# Altium PCB Breakout_board.PcbDoc
Units mil, origin at the board's own origin, x right, y up, seen from the top; angles counter-clockwise.
Board outline 2210.03 x 2900.03 mil, 2 copper layers (Top Layer, Bottom Layer), stack 62.2 mil thick; 11 components, 34 nets, 128 pads, 0 vias.
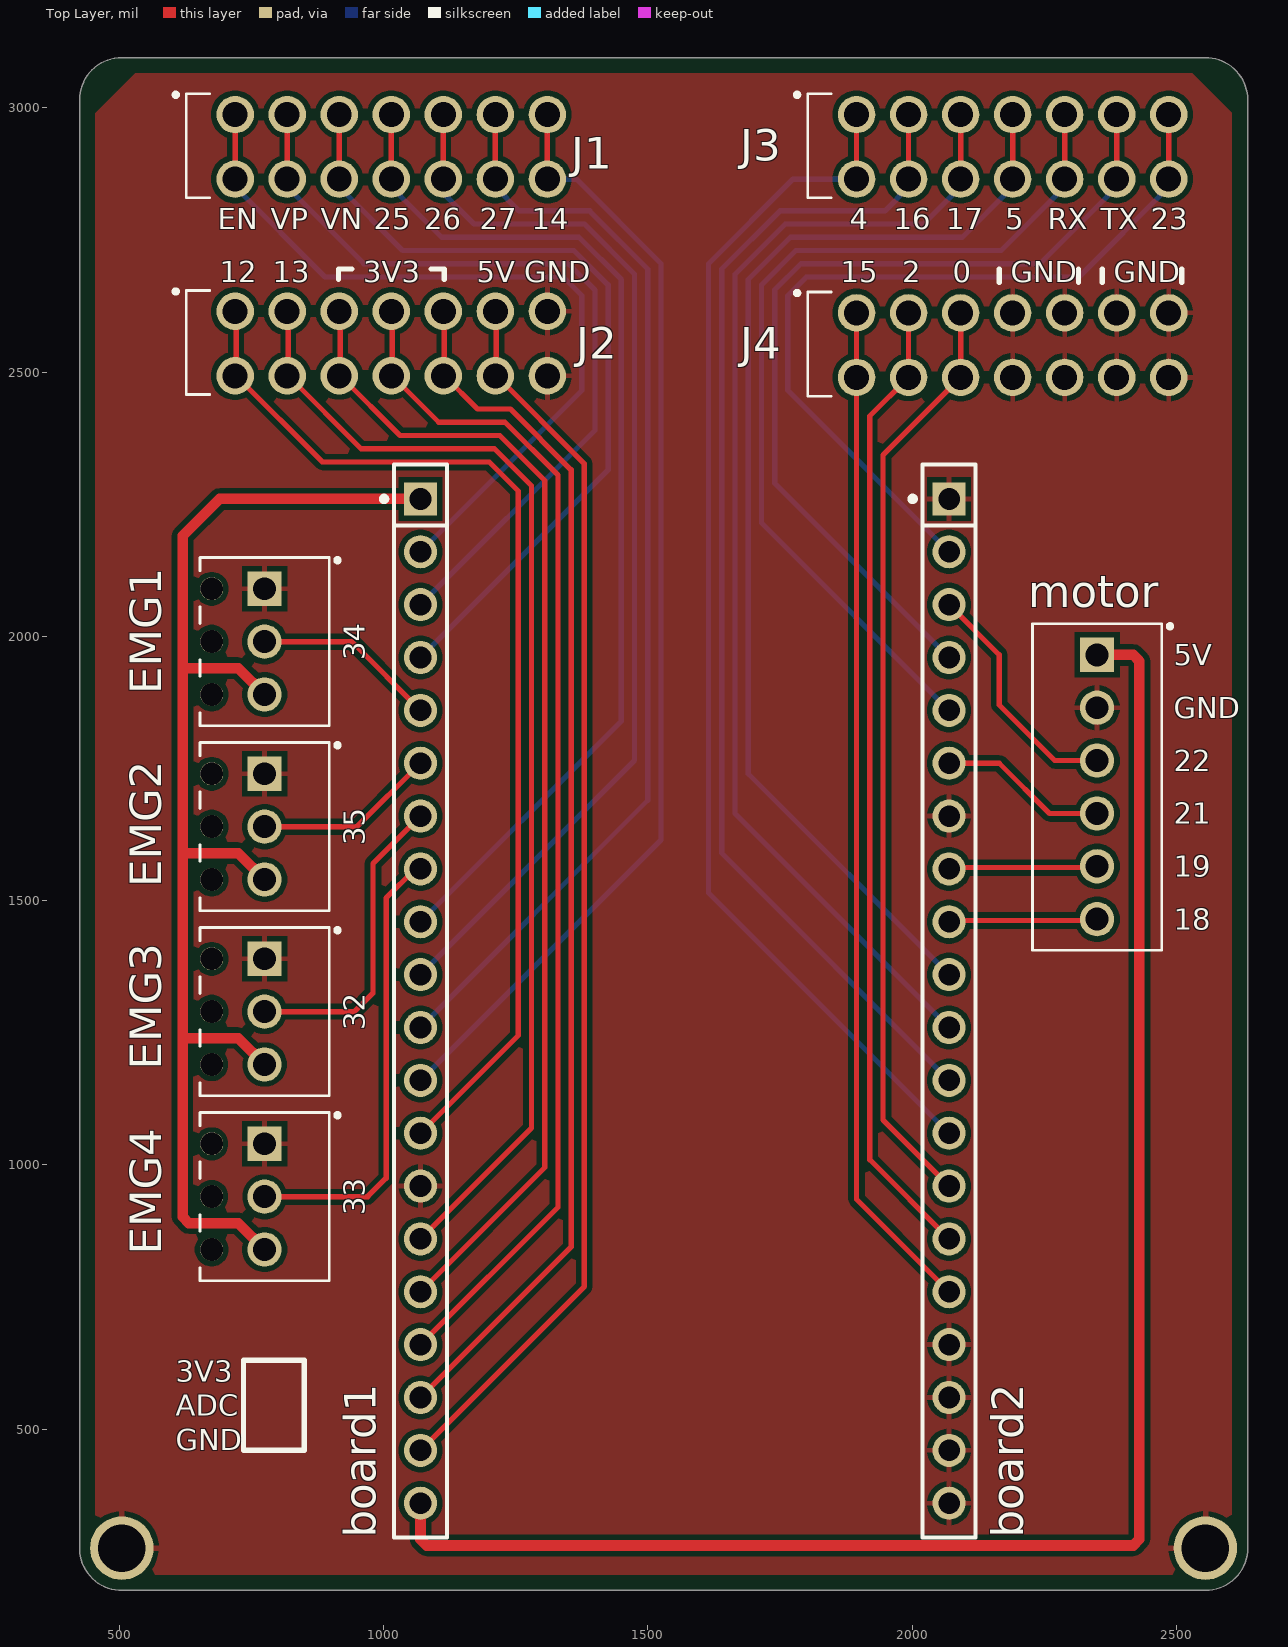
[diagram p0: Top Layer view]
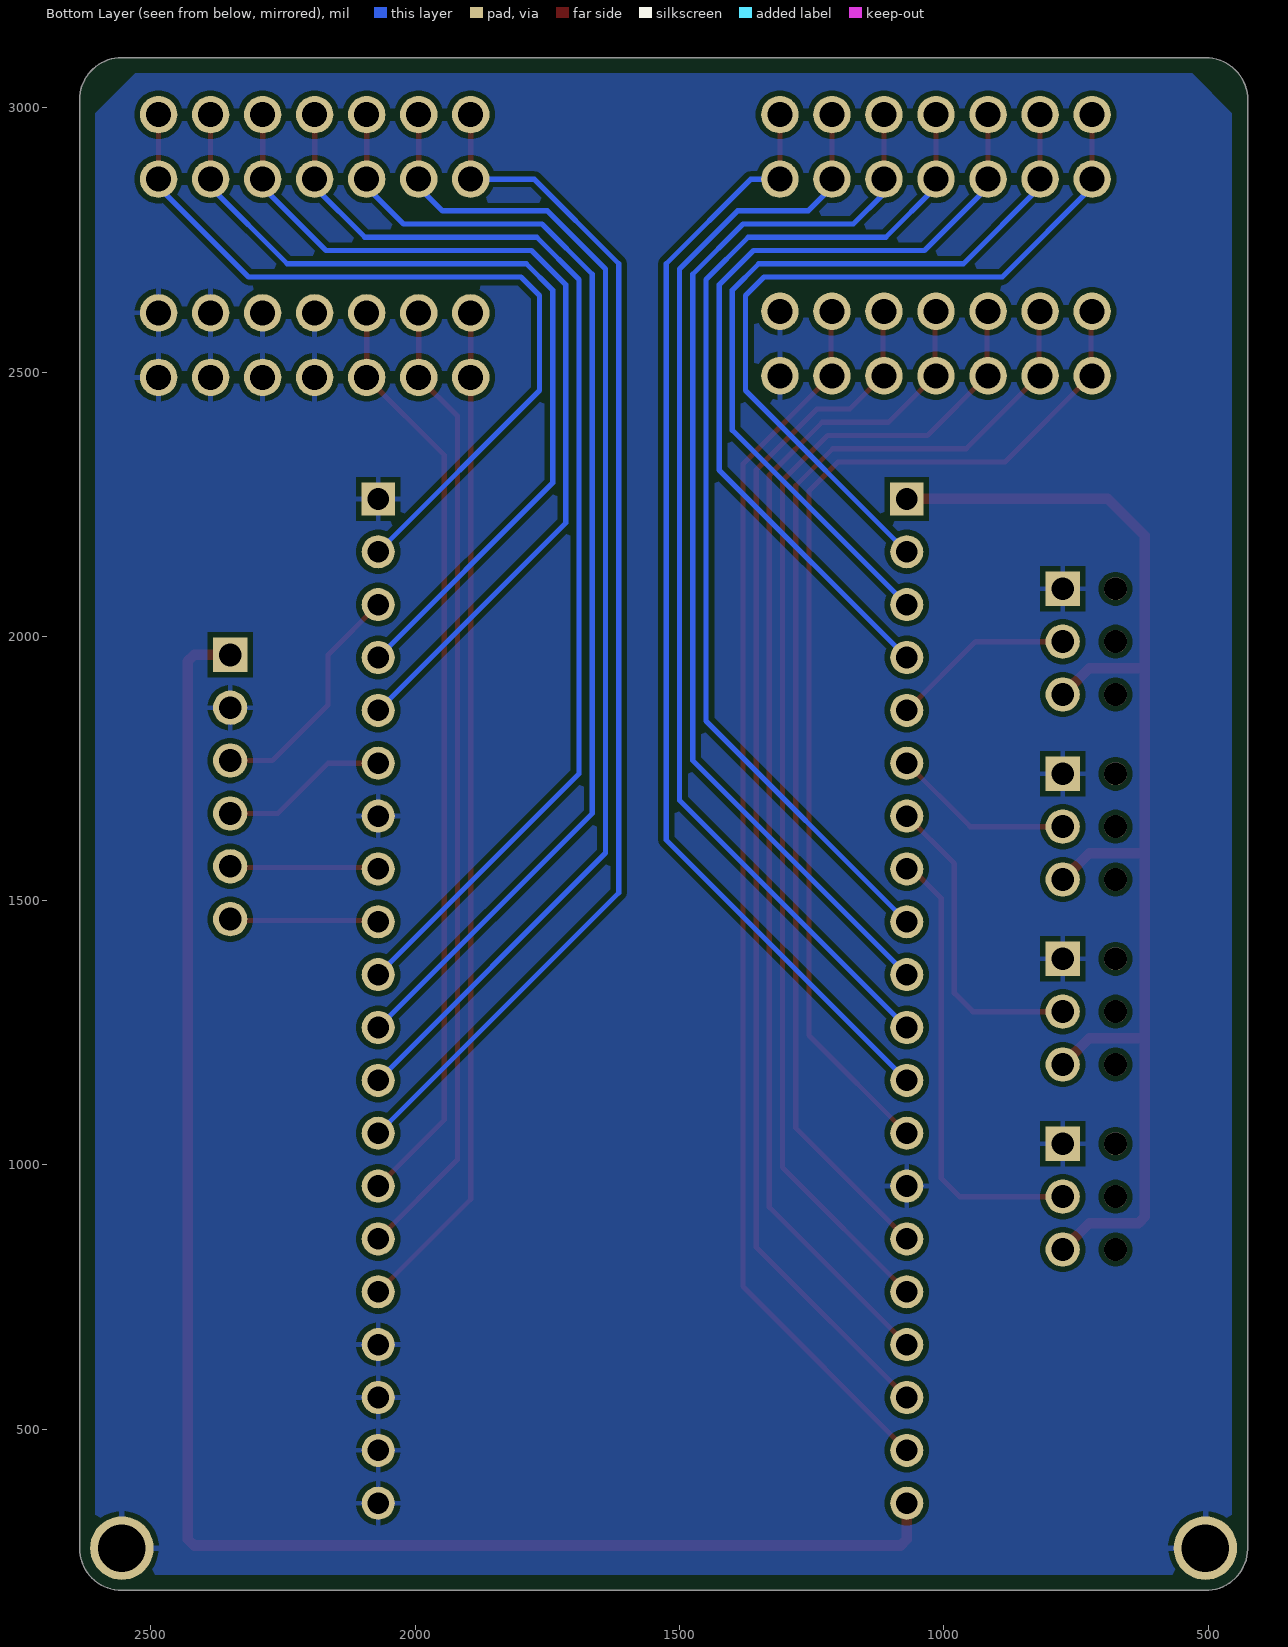
[diagram p1: Bottom Layer view, seen from below]
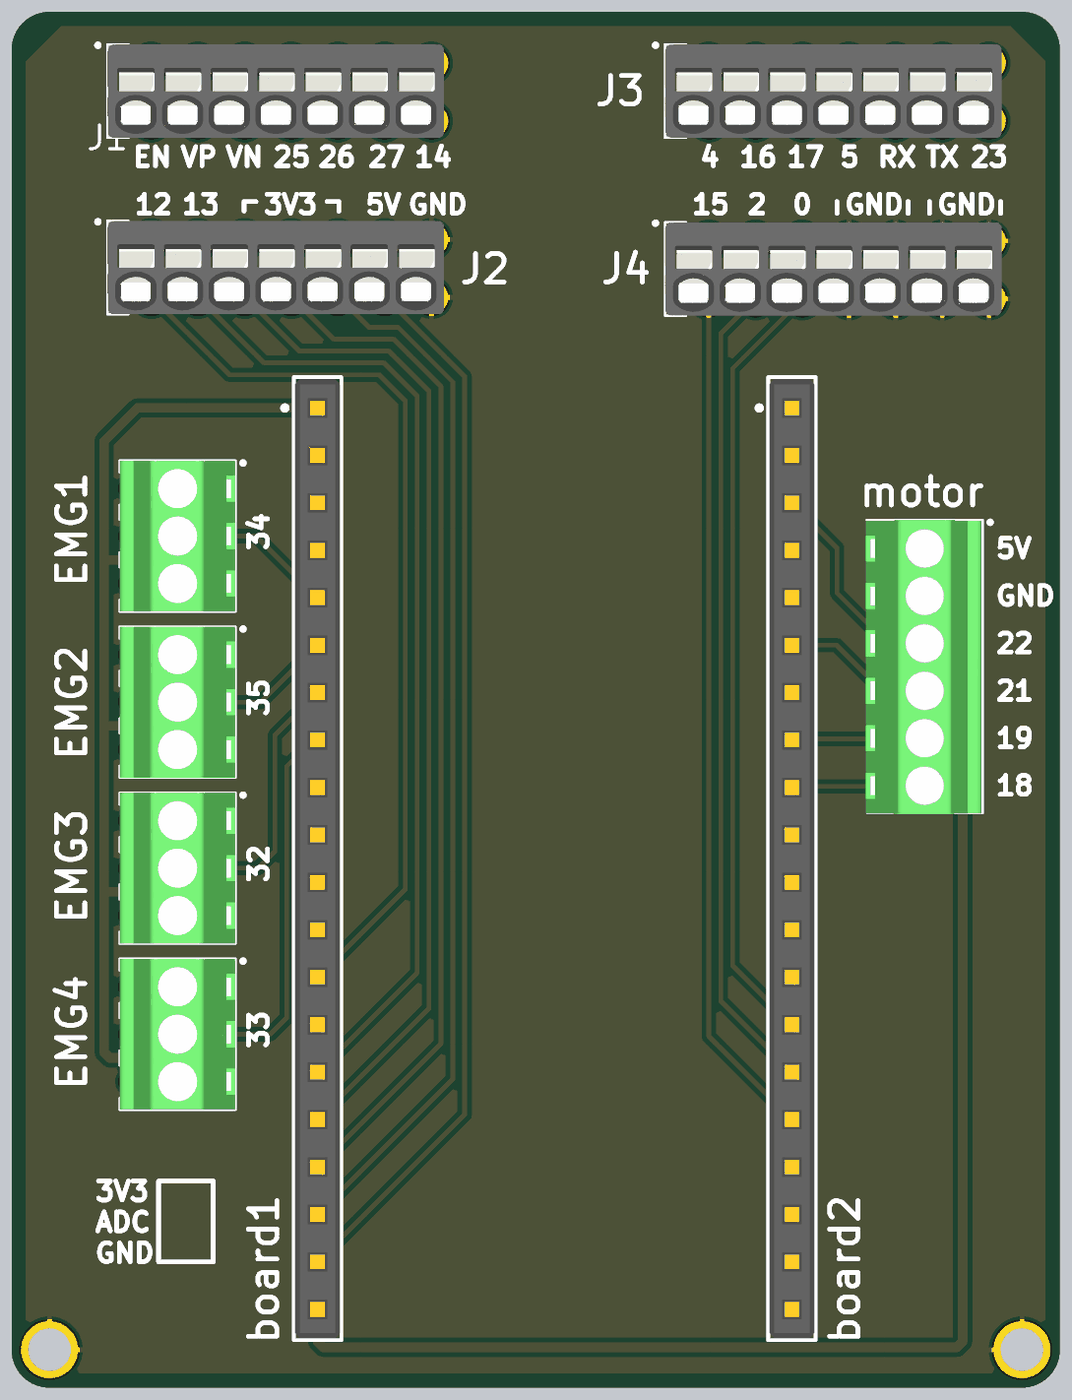
[diagram p2: 3D render of the assembled board from above, using the file's embedded part models]

## Layer stack, top to bottom
Top Solder: solder mask 0.4, Solder Resist, Dk 3.5
Top Layer: signal copper 1.4
Dielectric 1: dielectric 59.4, FR-4, Dk 4.8
Bottom Layer: signal copper 1.4
Bottom Solder: solder mask 0.4, Solder Resist, Dk 3.5

## Board outline
425,273.26 424.98,3015 424.99,3015.09 cw(c505,3015) 505,3095.01 505.04,3095.01 2555,3095.01 cw(c2555,3015) 2635.01,3015 2635.01,3014.92 2635.02,275 2635.01,274.95 cw(c2555,275) 2555,194.99 505.71,194.99 cw(c505,275)

## Design rules (kind name [scope] priority, off if disabled: settings)
Clearance [All] p1: gap=10 ignorepadtopadclearanceinfootprint=FALSE
PolygonConnect [All] p1: connectstyle=Relief reliefconductorwidth=10 reliefentries=4 polygonreliefangle="90 Angle" airgapwidth=10
RoutingVias [All] p1: holewidth=28 width=50 viastyle="Through Hole" minholewidth=28 minwidth=50 maxholewidth=28 maxwidth=50
SolderMaskExpansion [All] p1: expansion=4 istentingtop=FALSE
SupplyNets "Schematic Supply Nets" [InNet('GND')] p1: voltage=0.000
Width Width_voltage [InNet('Net _1') Or  InNet('Net _20')] p1: maxlimit=20 minlimit=20 preferedwidth=20
Width [All] p2: maxlimit=10 minlimit=10 preferedwidth=10
30 further rules are at their usual default settings.

## Components (designator, comment, footprint, x,y, rotation, side; value= is the part's Value field where it differs from the comment)
board1 "SSW-120-01-G-S" FP-SSW-120-01-G-S-MFG 1070,1310 r270 top
board2 "SSW-120-01-G-S" FP-SSW-120-01-G-S-MFG 2070,1310 r270 top
EMG1 "1725669" PHOENIX_1725669 652.95,2149.06 r270 top
EMG2 "1725669" PHOENIX_1725669 652.95,1799.06 r270 top
EMG3 "1725669" PHOENIX_1725669 652.95,1449.06 r270 top
EMG4 "1725669" PHOENIX_1725669 652.95,1099.06 r270 top
J1 "1771004" PHOENIX_1771004 626.93,2829.57 r0 top locked
J2 "1771004" PHOENIX_1771004 626.93,2457.52 r0 top locked
J3 "1771004" PHOENIX_1771004 1802.48,2829.57 r0 top locked
J4 "1771004" PHOENIX_1771004 1802.48,2454.57 r0 top locked
motor "1725698" PHOENIX_1725698 2227.95,2024.06 r270 top

## Footprints (in the part's own frame and the unit in brackets; to place one, negate y for a bottom-side part, rotate by r counter-clockwise, add the part's x,y. Pads: shape width x height; smd on the part's side, far side on the other; paste and mask are expansions set on the pad)
FP-SSW-120-01-G-S-MFG [mm]
  rect 1.59x1.59 hole 1.04 paste-2539.97 mask+0: 1(-24.13,0)
  round 1.59 hole 1.04 paste-2539.97 mask+0: 2(-21.59,0) 3(-19.05,0) 4(-16.51,0) 5(-13.97,0) 6(-11.43,0) 7(-8.89,0) 8(-6.35,0) 9(-3.81,0) 10(-1.27,0) 11(1.27,0) 12(3.81,0) 13(6.35,0) 14(8.89,0) 15(11.43,0) 16(13.97,0) 17(16.51,0) 18(19.05,0) 19(21.59,0) 20(24.13,0)
  silkscreen extent -25.78,-1.87 25.78,1.27, body extent -25.88,-1.37 25.88,1.37, height 0.25
PHOENIX_1725669 [mm]
  rect 1.65x1.65 / inner round 1.65 / far side rect 1.65x1.65 hole 1.1: 1(1.5,3.1)
  round 1.65 hole 1.1: 2(4.04,3.1) 3(6.58,3.1)
  round 1.1 hole 1.1 unplated: ""(1.5,0.56) ""(4.04,0.56) ""(6.58,0.56)
  silkscreen extent 0,0 8.08,6.7, body extent 0,0 8.08,6.2, height 8.65
PHOENIX_1725698 [mm]
  rect 1.65x1.65 / inner round 1.65 / far side rect 1.65x1.65 hole 1.1: 1(1.5,3.1)
  round 1.65 hole 1.1: 2(4.04,3.1) 3(6.58,3.1) 4(9.12,3.1) 5(11.66,3.1) 6(14.2,3.1)
  silkscreen extent 0,0 15.7,6.7, body extent 0,-0.05 15.76,6.15, height 8.5
PHOENIX_1771004 [mm]
  round 1.8 hole 1.2 mask+0.102: 1_1(2.35,4) 1_2(2.35,0.9) 2_1(4.85,4) 2_2(4.85,0.9) 3_1(7.35,4) 3_2(7.35,0.9) 4_1(9.85,4) 4_2(9.85,0.9) 5_1(12.35,4) 5_2(12.35,0.9) 6_1(14.85,4) 6_2(14.85,0.9) 7_1(17.35,4) 7_2(17.35,0.9)
  silkscreen extent -0.61,0 1.13,5.05, body extent 0.01,0 18.03,5, height 10

## Part data
board1 board2: library part CMP-00575-00296075-1, "SSW-120-01-G-S SSW - Samtec 2.54mm Single Row Straight Socket Strip 8.5 Profile (mcv)(TO22)", Color=Black, Contact Resistance=10mΩ, Current Rating=6.9A, Manufacturer Lifecycle Status=PRODUCTION, Max Operating Temperature=125°C, Max Voltage Rating (AC)=550V, Min Operating Temperature=-55°C, Voltage Rating (AC)=465V, Voltage Rating (DC)=655V, Connector Type="Receptacle, Socket", Contact Material=Bronze, Contact Plating=Gold, Depth=2.41mm, Gender=Receptacle, Housing Color=Black, Housing Material=Polymer, Lead Free="Lead Free", Lead Length=2.64mm, Lead Pitch=2.54mm, Length=51.31mm, Lifecycle Status=Production, Max Current Rating=6.9A, Mount="Through Hole", NexarPartId=296075, Number of Contacts=20, Number of Positions=20, Number of Rows=1, Orientation=Straight, Pitch=2.54mm, Radiation Hardening=No, REACH SVHC="No SVHC", RoHS=Compliant, Termination=Solder, Voltage Rating=550V
EMG1 EMG2 EMG3 EMG4: "PCB Terminal Screw 2.54mm 20AWG 160V 6A 3 Position COMBICON MPT Series", Package=None, Check_prices=https://www.snapeda.com/parts/1725669/Phoenix+Contact/view-part/?ref=eda, MF="Phoenix Contact", MP=1725669, SnapEDA_Link=https://www.snapeda.com/parts/1725669/Phoenix+Contact/view-part/?ref=snap
J1 J2 J3 J4: "PCB Terminal Push-In 2.5mm 20AWG 160V 6A 7 Position COMBICON PTSM Series", MANUFACTURER="Phoenix Contact", DATASHEET_URL=https://s3.amazonaws.com/snapeda/datasheet/1771004_Phoenix_Contact.pdf, MPN=1771004, SOURCE_URL=https://www.snapeda.com/parts/1771004/Phoenix+Contact/view-part/
motor: "PCB Terminal Screw 2.54mm 20AWG 160V 6A 6 Position COMBICON MPT Series", Package=None, Check_prices=https://www.snapeda.com/parts/1725698/Phoenix+Contact/view-part/?ref=eda, MF="Phoenix Contact", MP=1725698, SnapEDA_Link=https://www.snapeda.com/parts/1725698/Phoenix+Contact/view-part/?ref=snap

## Free pads (board coordinates)
  round 120 hole 90: 5(505,275) 5(2555,275)

## Nets (pads, with @x,y where several pads share a name; then routed paths per layer and width w, separated by ;. In a path a pad name is that pad's centre, name@x,y a point inside that pad or via, vN(x,y) a via of type N, cw(c..) or ccw(c..) an arc to the next point about the centre after c; other vN are vias at no path point)
GND: board1.14 board2.1 board2.7 board2.17 board2.18 board2.19 board2.20 EMG1.1 EMG2.1 EMG3.1 EMG4.1 J2.7_1 J2.7_2 J4.4_1 J4.4_2 J4.5_1 J4.5_2 J4.6_1 J4.6_2 J4.7_1 J4.7_2 motor.2 pad.5
Netboard1_1: board1.1 EMG1.3 EMG2.3 EMG3.3 EMG4.3 | length 2475
  Top Layer w20: EMG4.3 725,890 631.72,890 620,901.72 620,1240 ; EMG3.3 725,1240 620,1240 ; EMG2.3 725,1590 620,1590 ; EMG1.3 725,1940 620,1940 ; board1.1 690,2260 620,2190 620,1940 ; 620,1240 620,1265 620,1270 620,1590 ; 620,1590 620,1940
Netboard1_2: board1.2 J1.1_1 J1.1_2 | length 1473.8
  Top Layer w10: J1.1_2@719.45,2850 J1.1_1@719.45,2972.05
  Bottom Layer w10: J1.1_2@719.45,2850 889.45,2680 1340,2680 1375,2645 1375,2465 board1.2
Netboard1_3: board1.3 J1.2_1 J1.2_2 | length 1516.6
  Top Layer w10: J1.2_2@817.87,2850 J1.2_1@817.87,2972.05
  Bottom Layer w10: J1.2_2@817.87,2850 962.87,2705 1350,2705 1400,2655 1400,2390 board1.3
Netboard1_4: board1.4 J1.3_1 J1.3_2 | length 1559.4
  Top Layer w10: J1.3_2@916.3,2850 J1.3_1@916.3,2972.05
  Bottom Layer w10: J1.3_2@916.3,2850 1036.3,2730 1360,2730 1425,2665 1425,2315 board1.4
Netboard1_5: board1.5 EMG1.2 | length 348.8
  Top Layer w10: EMG1.2 940,1990 board1.5
Netboard1_6: board1.6 EMG2.2 | length 344.7
  Top Layer w10: EMG2.2 950,1640 board1.6
Netboard1_7: board1.7 EMG3.2 | length 591.8
  Top Layer w10: EMG3.2 945,1290 980,1325 980,1570 board1.7
Netboard1_8: board1.8 EMG4.2 | length 862.3
  Top Layer w10: EMG4.2 970,940 1005,975 1005,1505 1060,1560 board1.8
Netboard1_9: board1.9 J1.4_1 J1.4_2 | length 2002.2
  Top Layer w10: J1.4_2@1014.72,2850 J1.4_1@1014.72,2972.05
  Bottom Layer w10: J1.4_2@1014.72,2850 1109.72,2755 1370,2755 1450,2675 1450,1840 board1.9
Netboard1_10: board1.10 J1.5_1 J1.5_2 | length 2039.7
  Top Layer w10: J1.5_2@1113.15,2850 J1.5_1@1113.15,2972.05
  Bottom Layer w10: board1.10 1475,1765 1475,2685 1380,2780 1171.38,2780 J1.5_2@1113.43,2837.95
Netboard1_11: board1.11 J1.6_1 J1.6_2 | length 2087.8
  Top Layer w10: J1.6_2@1211.57,2850 J1.6_1@1211.57,2972.05
  Bottom Layer w10: board1.11 1500,1690 1500,2695 1390,2805 1256.57,2805 J1.6_2@1211.57,2850
Netboard1_12: board1.12 J1.7_1 J1.7_2 | length 2136.8
  Top Layer w10: J1.7_2@1310,2850 J1.7_1@1310,2972.05
  Bottom Layer w10: board1.12 1525,1615 1525,2705 1365,2865 J1.7_2
Netboard1_13: board1.13 J2.1_1 J2.1_2 | length 2037.7
  Top Layer w10: J2.1_1@721.3,2615 721.3,2492.95 884.25,2330 1200,2330 1255,2275 1255,1245 board1.13
Netboard1_15: board1.15 J2.2_1 J2.2_2 | length 2180.4
  Top Layer w10: J2.2_1@819.72,2615 819.72,2492.95 957.68,2355 1210,2355 1280,2285 1280,1070 board1.15
Netboard1_16: board1.16 J2.3_1 J2.3_2 | length 2223.2
  Top Layer w10: J2.3_1@918.15,2615 918.15,2492.95 1031.1,2380 1220,2380 1305,2295 1305,995 board1.16
Netboard1_17: board1.17 J2.4_1 J2.4_2 | length 2266
  Top Layer w10: J2.4_1@1016.57,2615 1016.57,2492.95 1104.53,2405 1230,2405 1330,2305 1330,920 board1.17
Netboard1_18: board1.18 J2.5_1 J2.5_2 | length 2308.8
  Top Layer w10: board1.18 1355,845 1355,2315 1240,2430 1177.95,2430 1115,2492.95 J2.5_1@1115,2615
Netboard1_19: board1.19 J2.6_1 J2.6_2 | length 2352.4
  Top Layer w10: board1.19 1380,770 1380,2326.38 1213.43,2492.95 J2.6_1@1213.43,2615
Netboard1_20: board1.20 motor.1 | length 3184.4
  Top Layer w20: board1.20 1070,291.72 1081.72,280 2418.28,280 2430,291.72 2430,1953.28 2418.28,1965 motor.1
Netboard2_2: board2.2 J3.7_1 J3.7_2 | length 1538.8
  Top Layer w10: J3.7_2@2485.55,2850 J3.7_1@2485.55,2972.05
  Bottom Layer w10: board2.2 1765,2465 1765,2645 1800,2680 2315.55,2680 J3.7_2@2485.55,2850
Netboard2_3: board2.3 motor.3 | length 457.8
  Top Layer w10: board2.3 2165,1965 2165,1870 2270,1765 motor.3
Netboard2_4: board2.4 J3.6_1 J3.6_2 | length 1681.6
  Top Layer w10: J3.6_2@2387.13,2850 J3.6_1@2387.13,2972.05
  Bottom Layer w10: board2.4 1740,2290 1740,2655 1790,2705 2242.13,2705 J3.6_2@2387.13,2850
Netboard2_5: board2.5 J3.5_1 J3.5_2 | length 1724.4
  Top Layer w10: J3.5_2@2288.7,2850 J3.5_1@2288.7,2972.05
  Bottom Layer w10: board2.5 1715,2215 1715,2665 1780,2730 2168.7,2730 J3.5_2@2288.7,2850
Netboard2_6: board2.6 motor.4 | length 319.4
  Top Layer w10: board2.6 2165,1760 2260,1665 motor.4
Netboard2_8: board2.8 motor.5 | length 282.1
  Top Layer w10: board2.8 2072.5,1562.5 2347.5,1562.5 motor.5
Netboard2_9: board2.9 motor.6 | length 282.1
  Top Layer w10: board2.9 2072.5,1462.5 2347.5,1462.5 motor.6
Netboard2_10: board2.10 J3.4_1 J3.4_2 | length 2167.2
  Top Layer w10: J3.4_2@2190.28,2850 J3.4_1@2190.28,2972.05
  Bottom Layer w10: board2.10 1690,1740 1690,2675 1770,2755 2095.28,2755 J3.4_2@2190.28,2850
Netboard2_11: board2.11 J3.3_1 J3.3_2 | length 2210
  Top Layer w10: J3.3_2@2091.85,2850 J3.3_1@2091.85,2972.05
  Bottom Layer w10: board2.11 1665,1665 1665,2685 1760,2780 2021.85,2780 J3.3_2@2091.85,2850
Netboard2_12: board2.12 J3.2_1 J3.2_2 | length 2252.8
  Top Layer w10: J3.2_2@1993.43,2850 J3.2_1@1993.43,2972.05
  Bottom Layer w10: J3.2_2@1993.43,2850 1948.43,2805 1750,2805 1640,2695 1640,1590 board2.12
Netboard2_13: board2.13 J3.1_1 J3.1_2 | length 2301.8
  Top Layer w10: J3.1_2@1895,2850 J3.1_1@1895,2972.05
  Bottom Layer w10: J3.1_2 1775,2865 1615,2705 1615,1515 board2.13
Netboard2_14: board2.14 J4.3_1 J4.3_2 | length 1764.7
  Top Layer w10: board2.14 1945,1085 1945,2343.15 J4.3_2 J4.3_1
Netboard2_15: board2.15 J4.2_1 J4.2_2 | length 1844.6
  Top Layer w10: J4.2_1 J4.2_2 1920,2416.57 1920,1010 board2.15
Netboard2_16: board2.16 J4.1_1 J4.1_2 | length 1924.5
  Top Layer w10: J4.1_1 1895,935 board2.16
pads on no net: EMG1. EMG2. EMG3. EMG4.

## Polygon pours and split planes (outlines as drawn)
GND on Bottom Layer "GND_L02_P000" (solid, pour order 0): 2605,2990 2530,3065 530,3065 455,2990 455,225 2605,225
GND on Top Layer "GND_L01_P001" (solid, pour order 1): 2530.17,3065 2604.71,2990.15 2604.71,225 454.71,225 454.71,2989.88 530.2,3065

## Silkscreen, mask and mechanical layers (free items; w line width, h text height)
Top Overlay:
  lines w10: 915,2675 915,2695 940,2695 ; 1090,2695 1115,2695 1115,2675 ; 2315,2670 2315,2695 ; 2360,2670 2360,2695 ; 2510,2670 2510,2695 ; 735,460 850,460 850,630.69 735,630.69 735,460 ; 2165,2670 2165,2695 2165,2670
  text "EN" at 686.68,2770.01 h40
  text "VP" at 786.68,2770.01 h40
  text "VN" at 881.68,2770.01 h40
  text "25" at 981.68,2770.01 h40
  text "26" at 1076.68,2770.01 h40
  text "27" at 1181.68,2770.01 h40
  text "14" at 1280.01,2770.01 h40
  text "4" at 1881.67,2770.01 h40
  text "16" at 1965.01,2770.01 h40
  text "17" at 2065.01,2770.01 h40
  text "5" at 2176.67,2770.01 h40
  text "RX" at 2256.68,2770.01 h40
  text "TX" at 2356.68,2770.01 h40
  text "23" at 2451.68,2770.01 h40
  text "12" at 690.01,2670.01 h40
  text "13" at 790.01,2670.01 h40
  text "3V3" at 961.68,2670.01 h40
  text "5V" at 1176.68,2670.01 h40
  text "GND" at 1266.68,2670.01 h40
  text "15" at 1865.01,2670.01 h40
  text "2" at 1981.67,2670.01 h40
  text "0" at 2076.67,2670.01 h40
  text "GND" at 2186.68,2670.01 h40
  text "GND" at 2381.68,2670.01 h40
  text "34" at 964.99,1955 h40 r90
  text "5V" at 2495,1945.01 h40
  text "GND" at 2495,1845.01 h40
  text "22" at 2495,1745.01 h40
  text "21" at 2495,1645.01 h40
  text "35" at 964.99,1605 h40 r90
  text "19" at 2495,1545.01 h40
  text "18" at 2495,1445.01 h40
  text "32" at 964.99,1255 h40 r90
  text "33" at 964.99,905 h40 r90
  text "3V3" at 606.68,590.01 h40
  text "ADC" at 606.68,525.01 h40
  text "GND" at 606.68,460.01 h40
Mechanical 1:
  lines w10: 430,273.66 430,3015 cw(c505,3015) 505,3090 2555,3090 cw(c2555,3015) 2630,3015 2630,275 cw(c2555,275) 2555,200 505,200 ; 430,275.66 ccw(c505,275) 505.66,200